# EAGLE board SIMON (EAGLE 9.6.2)
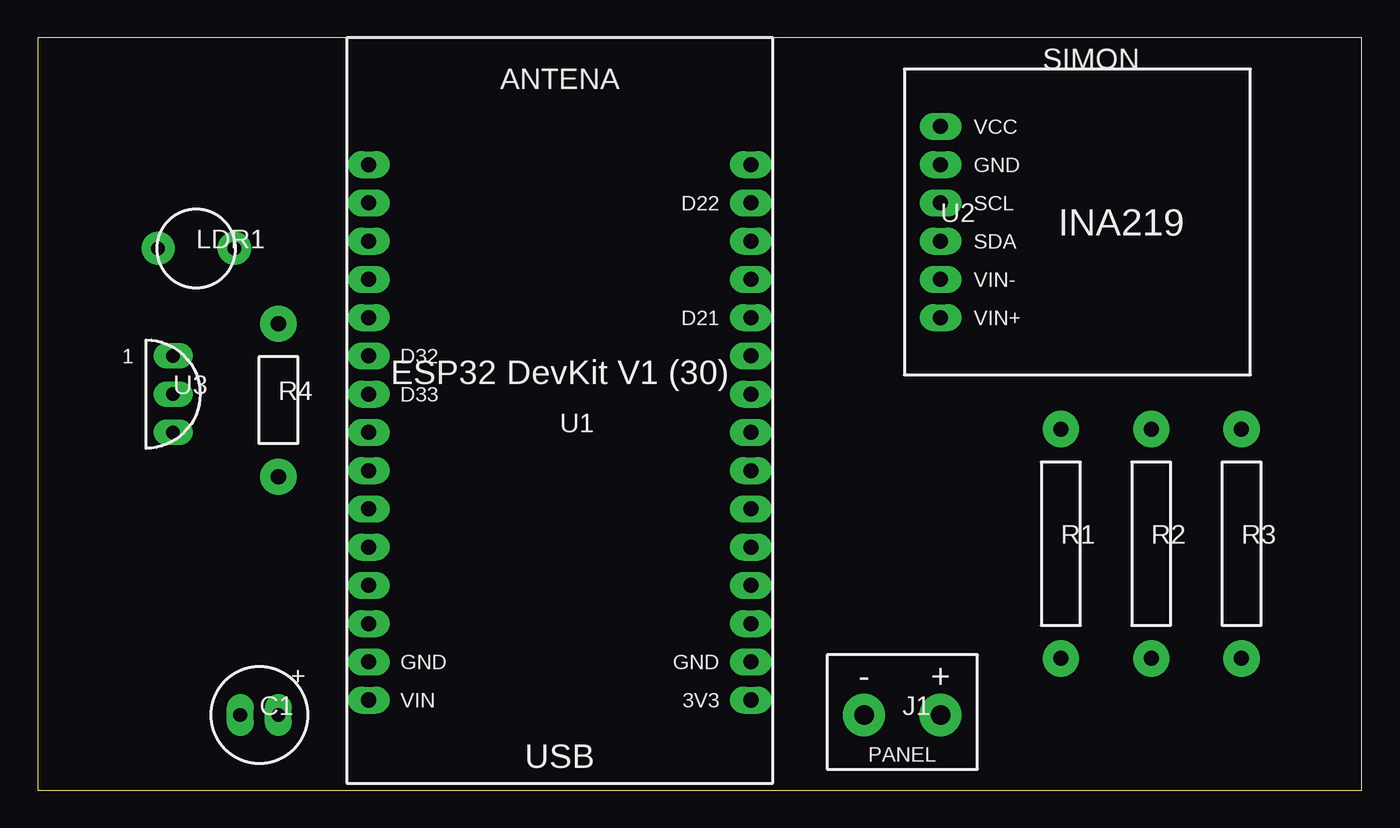
[diagram p0: board, top side]
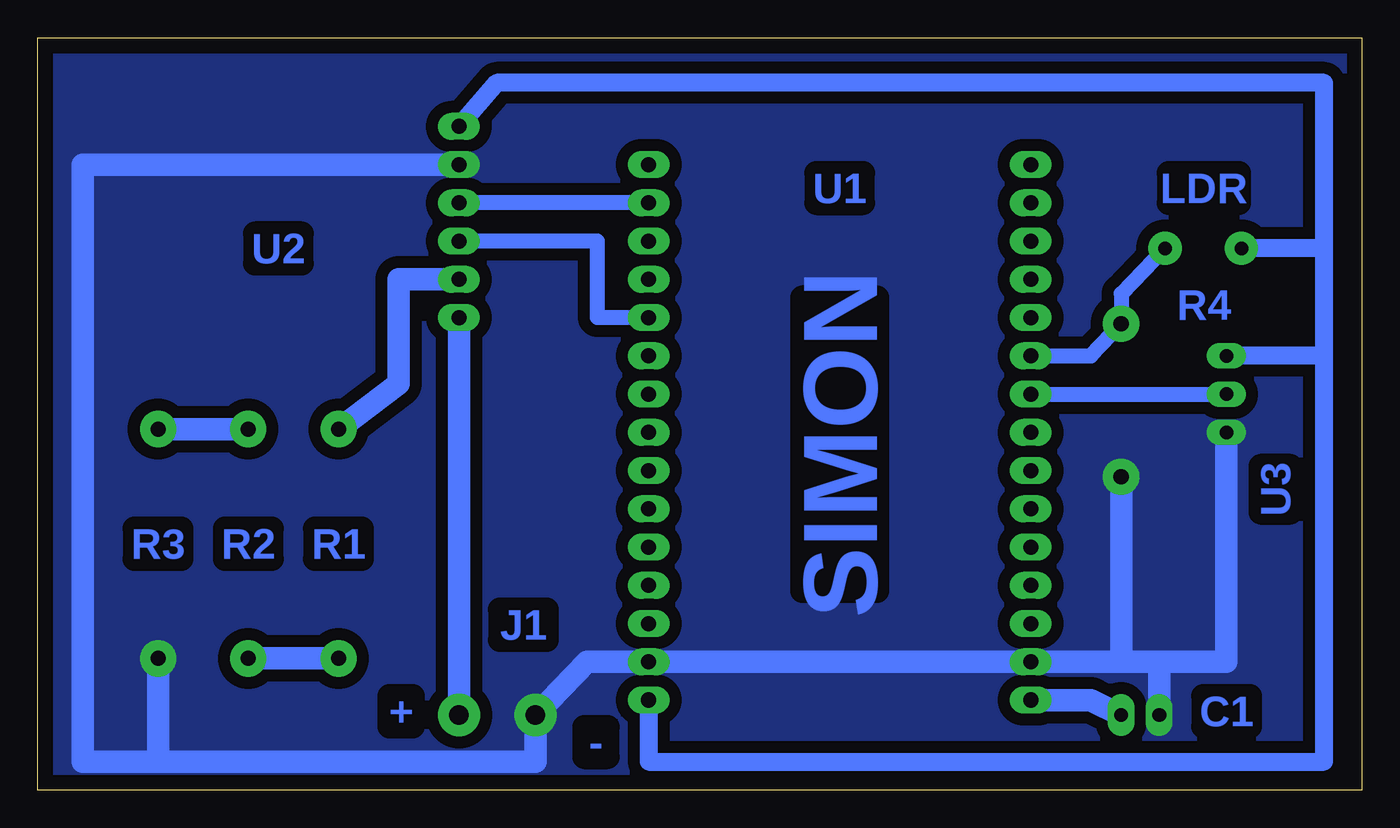
[diagram p1: board, bottom side, seen from below]

Size 88 x 50 mm. Coordinates in mm from the lower left corner, seen from the top.
Outline: 0,0 88,0 88,50 0,50 0,0
Copper layers (1*16): Top / Bottom
Design rules "simon_planchado": minimum track width 0.6mm, minimum drill 0.8mm, track to track 0.5mm, track to pad 0.5mm, pad to pad 0.5mm, via to via 0.5mm, copper to edge 1mm, minimum pad ring 0.4mm

## Footprints (pad centres in the part's own frame; a part is rotated, then mirrored left to right if it is on the bottom)
CPOL_2_54 = drill 0.9 pad 1.8 long: N -1.27,0; P 1.27,0
BORNERA_2_508 = drill 1.3 pad 2.8 round: N -2.54,0; P 2.54,0
LDR_5_08 = drill 0.9 pad 2.2 round: 1 -2.54,0; 2 2.54,0
R_15_24 = drill 1 pad 2.4 round: 1 0,7.62; 2 0,-7.62
R_10_16 = drill 1 pad 2.4 round: 1 0,5.08; 2 0,-5.08
ESP32_DEVKIT_30 = drill 1 pad 1.8 long: 3V3 12.7,-17.78; D2 12.7,-10.16; D4 12.7,-7.62; D5 12.7,0; D12 -12.7,-10.16; D13 -12.7,-12.7; D14 -12.7,-7.62; D15 12.7,-12.7; D18 12.7,2.54; D19 12.7,5.08; D21 12.7,7.62; D22 12.7,15.24; D23 12.7,17.78; D25 -12.7,0; D26 -12.7,-2.54; D27 -12.7,-5.08; D32 -12.7,5.08; D33 -12.7,2.54; D34 -12.7,10.16; D35 -12.7,7.62; EN -12.7,17.78; GND_L -12.7,-15.24; GND_R 12.7,-15.24; RX0 12.7,10.16; RX2 12.7,-5.08; TX0 12.7,12.7; TX2 12.7,-2.54; VIN -12.7,-17.78; VN -12.7,12.7; VP -12.7,15.24
INA219_HDR6 = drill 1 pad 1.8 long: GND 0,3.81; SCL 0,1.27; SDA 0,-1.27; VCC 0,6.35; VINN 0,-3.81; VINP 0,-6.35
TO92_LM35 = drill 0.9 pad 1.6 long: 1 0,2.54; 2 0,0; 3 0,-2.54

## Placement (x,y rotation side)
C1  100uF  [CPOL_2_54]  14.73,5 0 top
J1  PANEL  [BORNERA_2_508]  57.46,5 0 top
LDR1  LDR  [LDR_5_08]  10.54,36 0 top
R1  10  [R_15_24]  68,16.38 0 top
R2  10  [R_15_24]  74,16.38 0 top
R3  10  [R_15_24]  80,16.38 0 top
R4  10k  [R_10_16]  16,25.92 0 top
U1  ESP32  [ESP32_DEVKIT_30]  34.7,23.78 0 top
U2  INA219  [INA219_HDR6]  60,37.75 0 top
U3  LM35  [TO92_LM35]  9,26.32 0 top

## Library data of the parts
C1 J1 LDR1 R1-R4 U1-U3 = simon

## Nets
3V3: LDR1.1 U1.3V3 U2.VCC U3.1
GND: C1.N J1.N R3.2 R4.2 U1.GND_L U1.GND_R U2.GND U3.3
LUZ: LDR1.2 R4.1 U1.D32
N_R1R2: R1.2 R2.2
N_R2R3: R2.1 R3.1
SCL: U1.D22 U2.SCL
SDA: U1.D21 U2.SDA
TEMP: U1.D33 U3.2
VCARGA: R1.1 U2.VINN
VIN: C1.P U1.VIN
VSOLAR: J1.P U2.VINP

## Tracks (layer width: path | path; a pad name or v marks a point on that pad's centre or on a via)
3V3
  Bottom 1.2: U1.3V3 47.4,1.9 2.5,1.9 2.5,28.86 | 2.5,28.86 2.5,36 | 2.5,36 2.5,47 57.5,47 U2.VCC | 2.5,28.86 U3.1 | 2.5,36 LDR1.1
GND
  Bottom 1.5: U3.3 9,8.54 13.46,8.54 | 13.46,8.54 16,8.54 | 16,8.54 U1.GND_L U1.GND_R 51.5,8.54 J1.N 54.92,1.9 80,1.9 | C1.N 13.46,8.54 | R4.2 16,8.54 | 80,1.9 85,1.9 85,41.56 U2.GND | R3.2 80,1.9
  pour Bottom (isolate 0.8, no thermals): 1,1 87,1 87,49 1,49
LUZ
  Bottom 1: U1.D32 18,28.86 R4.1 16,33 LDR1.2
N_R1R2
  Bottom 1.5: R1.2 R2.2
N_R2R3
  Bottom 1.5: R2.1 R3.1
SCL
  Bottom 1: U1.D22 U2.SCL
SDA
  Bottom 1: U1.D21 50.8,31.4 50.8,36.48 U2.SDA
TEMP
  Bottom 1: U1.D33 U3.2
VCARGA
  Bottom 1.5: U2.VINN 64,33.94 64,27 R1.1
VIN
  Bottom 1.5: U1.VIN 18,6 C1.P
VSOLAR
  Bottom 1.5: U2.VINP J1.P
(copper drawn outside any net)
  shapes: Bottom area x13

## Text on the board
Bottom: LDR | U1 | U2 | R4 | SIMON | U3 | R1 | R2 | R3 | J1 | C1 | + | -
tPlace: SIMON